# Altium PCB MainBoardPCB_4.PcbDoc (part 2 of 32)
Units mm, origin at the board's own origin, x right, y up, seen from the top; angles counter-clockwise.
Board outline 333.63 x 349.38 mm, 16 copper layers (L1, L2 (GND), L3 (Sign), L4 (GND), L5 (Sign), L6 (PWR/GND), L7(PWR/GND), L8 (Plane_GND), L9 (PWR/GND), L10 (PWR/GND), L11 (PWR/GND), L12 (Sign), L13 (GND), L14 (Sign), L15 (GND), L16), stack 2.502 mm thick; 2205 components, 1648 nets, 8314 pads, 3172 vias.
Unrouted connection lines stored in the file: 5141.
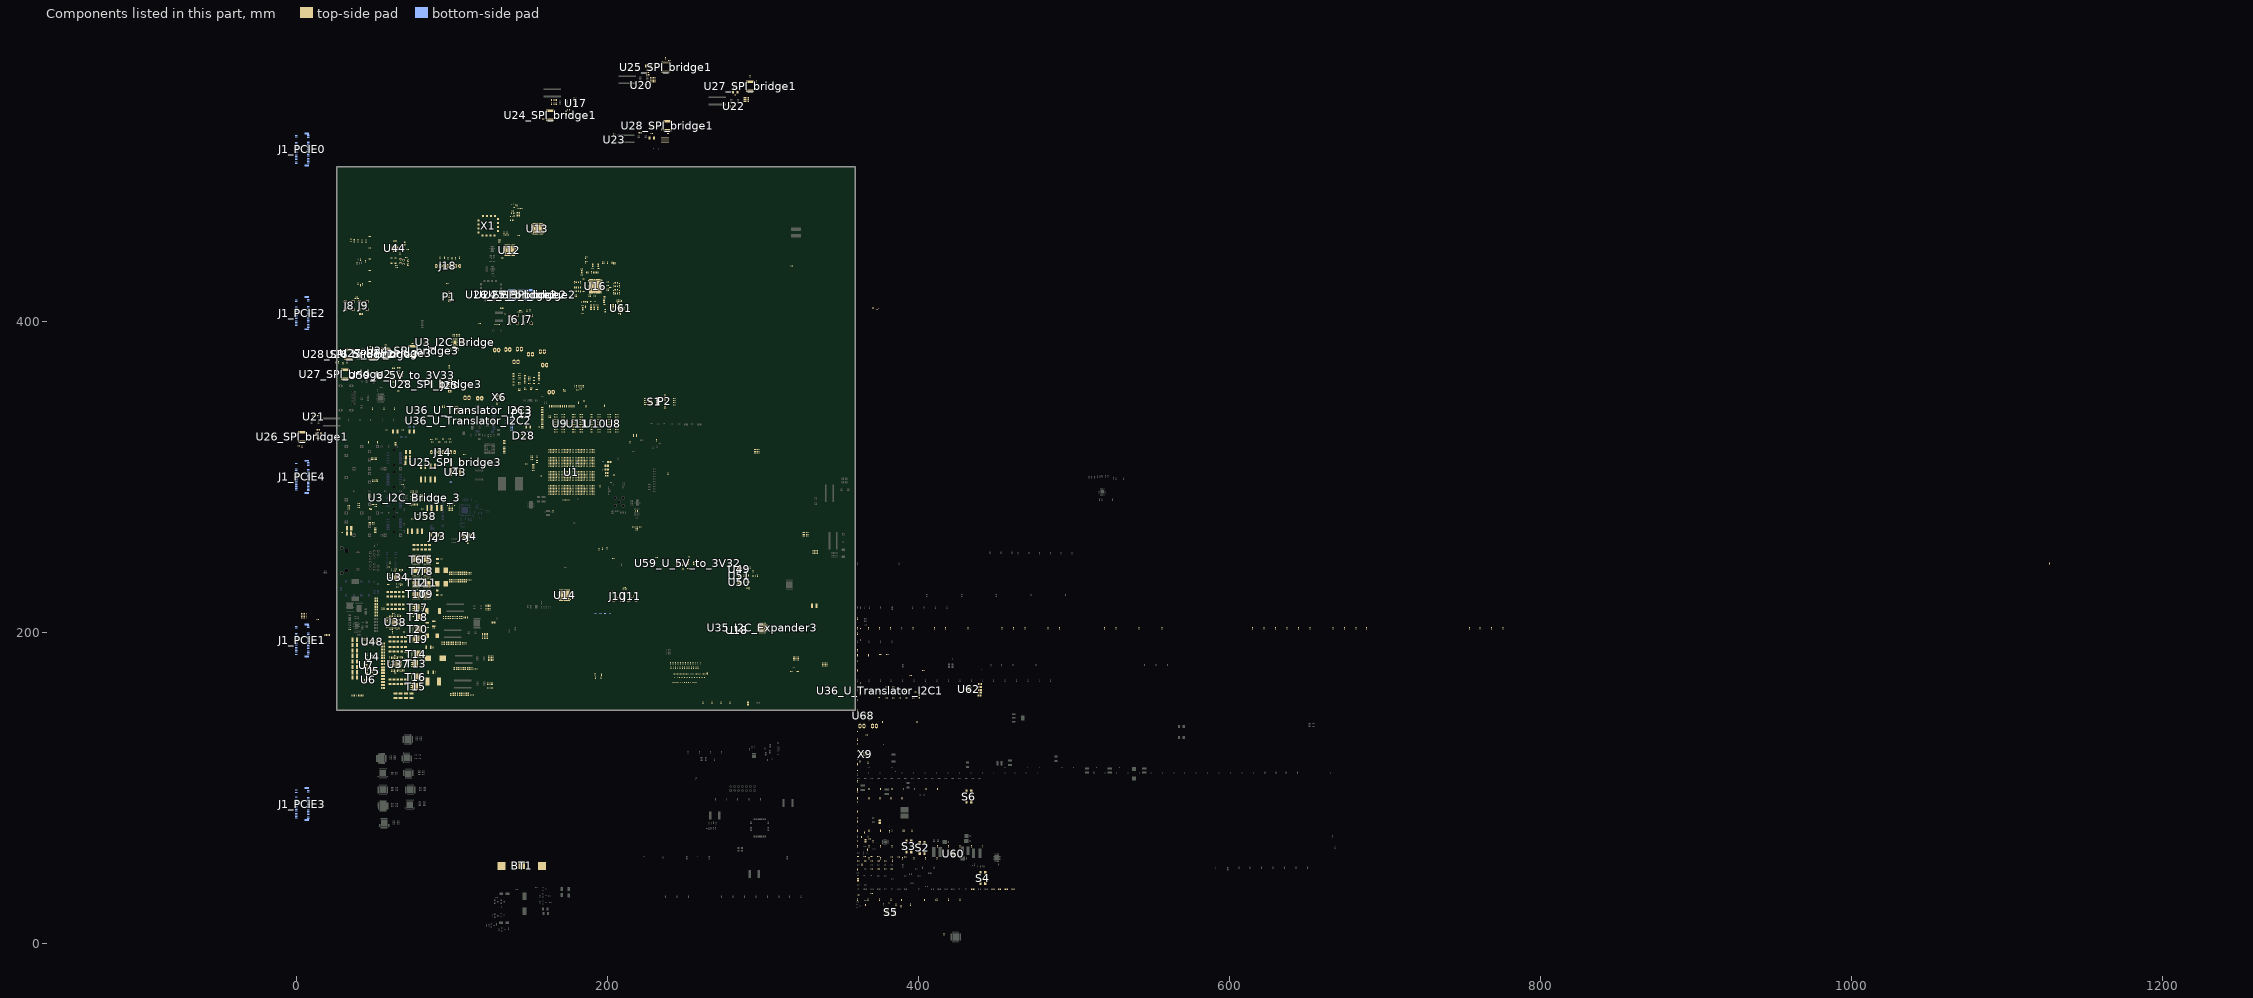
[diagram p14: the components of this part, seen from the top]

## Classes and differential pairs (continued)
differential pair class Diff_100: B223_Rx0 B223_Rx1 B223_Rx2 B223_Rx3 B223_Tx0_to_C B223_Tx0C_to_B B223_Tx1_to_C B223_Tx1C_to_B B223_Tx2_to_C B223_Tx2C_to_B B223_Tx3_to_C B223_Tx3C_to_B B224_Rx0 B224_Rx1 B224_Rx2 B224_Rx3 B224_Tx0_to_C B224_Tx0C_to_B B224_Tx1_to_C B224_Tx1C_to_B B224_Tx2_to_C B224_Tx2C_to_B B224_Tx3_to_C B224_Tx3C_to_B B225_Rx0 B225_Rx1 B225_Rx2 B225_Rx3 B225_Tx0_to_C B225_Tx0C_to_B B225_Tx1_to_C B225_Tx1C_to_B B225_Tx2_to_C B225_Tx2C_to_B B225_Tx3_to_C B225_Tx3C_to_B Bank223_MGTREF0_C Bank223_MGTREF1_C Bank224_MGTREF0_C Bank224_MGTREF1_C Bank225_MGTREF0_C Bank225_MGTREF1_C Bank505_MGTRREF0_C Bank505_MGTRREF2_C Bank505_MGTRREF3_C CLK_100 CLK_Fanout_In CLK_GTR_T1 CLK_GTR_T2 CLK_GTR_T3 CLK_Hi_Rail1 CLK_Hi_Rail1_SysRef CLK_Hi_Rail2 CLK_Hi_Rail2_SysRef CLK_M_OSC_In CLK_NVME_Conn CLK_Q223_T1 CLK_Q224_T1 CLK_Q225_T1 CLK_Q226_T1 CLK_SMA0 CLK_SMA0_C CLK_SMA1 CLK_SMA1_C CLK_SMA2 CLK_SMA2_C Data_2_RX_PCIE0 Data_2_RX_PCIE1 Data_2_RX_PCIE2 Data_2_RX_PCIE3 Data_2_TX_PCIE0 Data_2_TX_PCIE1 Data_2_TX_PCIE2 Data_2_TX_PCIE3 Data_3_RX_PCIE0 Data_3_RX_PCIE1 Data_3_RX_PCIE2 Data_3_RX_PCIE3 Data_3_TX_PCIE0 Data_3_TX_PCIE1 Data_3_TX_PCIE2 Data_3_TX_PCIE3 LTC6952_1_REF LTC6952_2_REF LTC6952_2_REF_SMA LTC6952_3_REF LTC6952_3_REF_SMA NVME_C_RX_O NVME_C_TX_1 NVME_C_TX_O NVMe_CLK NVMe_Rx_0 NVMe_Rx_1 NVMe_Tx_0 NVMe_Tx_1 Osc_in_Si53323_2 OSC_Out_DIV PCIE0_CLK PCIE0_Sync PCIE0_SysRef PCIE0_SysRef_FPGA PCIE1_CLK PCIE1_Sync PCIE1_SysRef PCIE1_SysRef_FPGA PCIE2_CLK PCIE2_Sync PCIE2_SysRef PCIE2_SysRef_FPGA PCIE3_CLK PCIE3_Sync PCIE3_SysRef PCIE3_SysRef_FPGA PCIE4_CLK PCIE4_Sync PCIE4_SysRef PCIE4_SysRef_FPGA RefClk_Si53323 SFP0_Rx SFP0_Tx SFP1_Rx SFP1_Tx SFP2_Rx SFP2_Tx SFP3_Rx SFP3_Tx SGMI_C_Rx SGMI_C_Tx SGMI_CLK_C_Out SGMI_CLK_Out SGMI_Rx SGMI_Tx Si53323_1_Q1 Si53323_1_Q2 Si53323_1_Q2_LVDS Si53323_2_CLK1 Si53323_2_Q1 Si53323_2_Q2 Si53323_2_Q2_LVDS SYNC_PCIE0 SYNC_PCIE1 SYNC_PCIE2 SYNC_PCIE3 SYNC_PCIE4 SYSREF_PCIE0 SYSREF_PCIE1 SYSREF_PCIE2 SYSREF_PCIE3 SYSREF_PCIE4 TD_A TD_B TD_C TD_D WR_LMK_CLK_HF1 WR_LMK_CLK_HF2 WR_LMK_CLK_IN WR_Source_CLK
channel class Translator_I2C: U_Translator_I2C1 U_Translator_I2C2 U_Translator_I2C3
channel class 5V_to_3V3: 5V_to_3V3_for_FTDI U_5V_to_3V32 U_5V_to_3V33
net class SYSREF: PCIE0_SysRef_N PCIE0_SysRef_P PCIE1_SysRef_N PCIE1_SysRef_P PCIE2_SysRef_N PCIE2_SysRef_P PCIE3_SysRef_N PCIE3_SysRef_P PCIE4_SysRef_N PCIE4_SysRef_P
net class Distr_to_Conn: PCIE0_CLK_P PCIE1_CLK_P PCIE2_CLK_P PCIE3_CLK_P PCIE4_CLK_P
net class SFP_diff: SFP0_Rx_N SFP0_Rx_P SFP0_Tx_N SFP0_Tx_P SFP1_Rx_N SFP1_Rx_P SFP1_Tx_N SFP1_Tx_P SFP2_Rx_N SFP2_Rx_P SFP2_Tx_N SFP2_Tx_P SFP3_Rx_N SFP3_Rx_P SFP3_Tx_N SFP3_Tx_P
net class Conn_to_C: B223_Tx0_to_C_N B223_Tx0_to_C_P B223_Tx1_to_C_N B223_Tx1_to_C_P B223_Tx2_to_C_N B223_Tx2_to_C_P B223_Tx3_to_C_N B223_Tx3_to_C_P B224_Tx0_to_C_N B224_Tx0_to_C_P B224_Tx1_to_C_N B224_Tx1_to_C_P B224_Tx2_to_C_N B224_Tx2_to_C_P B224_Tx3_to_C_N B224_Tx3_to_C_P B225_Tx0_to_C_N B225_Tx0_to_C_P B225_Tx1_to_C_N B225_Tx1_to_C_P B225_Tx2_to_C_N B225_Tx2_to_C_P B225_Tx3_to_C_N B225_Tx3_to_C_P Data_2_TX_PCIE0_N Data_2_TX_PCIE0_P Data_2_TX_PCIE1_N Data_2_TX_PCIE1_P Data_2_TX_PCIE2_N Data_2_TX_PCIE2_P Data_2_TX_PCIE3_N Data_2_TX_PCIE3_P Data_3_TX_PCIE0_N Data_3_TX_PCIE0_P Data_3_TX_PCIE1_N Data_3_TX_PCIE1_P Data_3_TX_PCIE2_N Data_3_TX_PCIE2_P Data_3_TX_PCIE3_N Data_3_TX_PCIE3_P
net class C_to_Bank225: B225_Tx0C_to_B_N B225_Tx0C_to_B_P B225_Tx1C_to_B_N B225_Tx1C_to_B_P B225_Tx2C_to_B_N B225_Tx2C_to_B_P B225_Tx3C_to_B_N B225_Tx3C_to_B_P
net class C_to_Bank224: B224_Tx0C_to_B_N B224_Tx0C_to_B_P B224_Tx1C_to_B_N B224_Tx1C_to_B_P B224_Tx2C_to_B_N B224_Tx2C_to_B_P B224_Tx3C_to_B_N B224_Tx3C_to_B_P
net class C_to_Bank223: B223_Rx0_N B223_Rx0_P B223_Rx1_N B223_Rx1_P B223_Rx2_N B223_Rx2_P B223_Rx3_N B223_Rx3_P B223_Tx0C_to_B_N B223_Tx0C_to_B_P B223_Tx1C_to_B_N B223_Tx1C_to_B_P B223_Tx2C_to_B_N B223_Tx2C_to_B_P B223_Tx3C_to_B_N B223_Tx3C_to_B_P
net class Bank_to_Conn: B223_Rx0_N B223_Rx0_P B223_Rx1_N B223_Rx1_P B223_Rx2_N B223_Rx2_P B223_Rx3_N B223_Rx3_P B224_Rx0_N B224_Rx0_P B224_Rx1_N B224_Rx1_P B224_Rx2_N B224_Rx2_P B224_Rx3_N B224_Rx3_P B225_Rx0_N B225_Rx0_P B225_Rx1_N B225_Rx1_P B225_Rx2_N B225_Rx2_P B225_Rx3_N B225_Rx3_P Data_2_RX_PCIE0_N Data_2_RX_PCIE0_P Data_2_RX_PCIE1_N Data_2_RX_PCIE1_P Data_2_RX_PCIE2_N Data_2_RX_PCIE2_P Data_2_RX_PCIE3_N Data_2_RX_PCIE3_P Data_3_RX_PCIE0_N Data_3_RX_PCIE0_P Data_3_RX_PCIE1_N Data_3_RX_PCIE1_P Data_3_RX_PCIE2_N Data_3_RX_PCIE2_P Data_3_RX_PCIE3_N Data_3_RX_PCIE3_P
component class U_Translator_I2C3: TP60_U_Translator_I2C3 TP61_U_Translator_I2C3 U36_U_Translator_I2C3
component class U_Translator_I2C2: TP60_U_Translator_I2C2 TP61_U_Translator_I2C2 U36_U_Translator_I2C2
component class U_Translator_I2C1: TP60_U_Translator_I2C1 TP61_U_Translator_I2C1 U36_U_Translator_I2C1
component class U_TPS7A88_5V_Dual_3: C572 C573 C574 C575 C576 C577 C578 C579 R436 R437 R438 R439 R440 R441 U61
component class U_LT3042_12V_5V_LNLDO: C580 C581 C582 C583 C584 FB34 R442 R443 R444 R445 U62
component class U_ADP1741_3: C568 C569 C570 C571 FB33 R433 R434 U60
component class U_5V_to_3V33: C563_U_5V_to_3V33 C564_U_5V_to_3V33 C565_U_5V_to_3V33 C566_U_5V_to_3V33 C567_U_5V_to_3V33 R430_U_5V_to_3V33 R431_U_5V_to_3V33 R432_U_5V_to_3V33 U59_U_5V_to_3V33
component class U_5V_to_3V32: C563_U_5V_to_3V32 C564_U_5V_to_3V32 C565_U_5V_to_3V32 C566_U_5V_to_3V32 C567_U_5V_to_3V32 R430_U_5V_to_3V32 R431_U_5V_to_3V32 R432_U_5V_to_3V32 U59_U_5V_to_3V32
component class SPI_bridge3: R231_SPI_bridge3 R232_SPI_bridge3 R233_SPI_bridge3 R234_SPI_bridge3 R235_SPI_bridge3 R236_SPI_bridge3 R237_SPI_bridge3 R238_SPI_bridge3 R239_SPI_bridge3 R240_SPI_bridge3 TP50_SPI_bridge3 TP51_SPI_bridge3 TP52_SPI_bridge3 TP53_SPI_bridge3 TP56_SPI_bridge3 TP57_SPI_bridge3 TP58_SPI_bridge3 TP59_SPI_bridge3 U24_SPI_bridge3 U25_SPI_bridge3 U26_SPI_bridge3 U27_SPI_bridge3 U28_SPI_bridge3
component class Ram_Power: C219 C220 C221 C222 C223 C224 C225 C226 C227 C228 C229 C230 C231 C232 C233 C234 C235 C236 C237 C238 C239 C240 C241 C242 C243 C244 C245 C246 C247 C248 C249 C250 C251 C252 C253 C254 C255 C256 C257 C258 C259 C260 C261 C262 C263 C264 C265 C266 C782 C783 C784 C785 C786 C787 C788 C789 R165 R166 R167 R168 R169 R170 R171 R172
component class PS_Config: C531 C532 C533 C534 C535 C536 D5 D6 D7 D8 D9 D10 D11 D12 P2 P3 P4 P5 R346 R347 R348 R349 R350 R351 R352 R353 R354 R355 R356 R357 R358 R359 R360 R361 R367 R368 R369 R370 R371 R372 R373 R374 R375 R716 R717 R718 R719 R720 S1 S2 S3 S4 U43 U44 X5 X6
component class IMU: C561 C562 R425 R426 R429 R600 R601 U58
component class GTR: C525 C526 C527 C528 C529 C530 C649 C651 C653 C677 C715 C716 C717 C718 R69 R70 R126
component class "Bank 225": C291 C292 C293 C294 C295 C296 C297 C298 C299 C300 C301 C302
component class "Bank 224": C279 C280 C281 C282 C283 C284 C285 C286 C287 C288 C289 C290
component class "Bank 223": C267 C268 C269 C270 C271 C272 C273 C274 C275 C276 C277 C278
component class U_Power_Ethernet: C550 C551 C552 C553 C554 C555 C654 C655 C656 C657 R391 R392 R393 R394 R396 R397 R399 R632 R633 R634 U49 U50 U51 U68
component class U_Power_ADP1850_Dual_2: C430 C431 C432 C433 C434 C435 C436 C437 C438 C439 C440 C441 C442 C443 C444 C445 C446 C447 C448 C449 C450 C451 C452 C453 C454 C455 C456 C457 C458 C459 C460 C461 C462 C463 C464 C465 C466 C467 C468 C469 C470 C548 C549 C645 C646 C647 C648 C650 C652 L19 L20 R302 R303 R306 R307 R310 R312 R313 R314 R315 R316 R317 R318 R625 R626 R627 R628 R629 R631 R686 R687 T17 T18 T19 T20 U38
component class U_HI_Curr_ADP1850_3: C389 C390 C391 C392 C393 C394 C395 C396 C397 C398 C399 C400 C401 C402 C403 C404 C405 C406 C407 C408 C409 C410 C411 C412 C413 C414 C415 C416 C417 C418 C419 C420 C421 C422 C423 C424 C425 C426 C427 C428 C429 C637 C638 C639 C640 C641 C642 C643 C644 L11 L12 R285 R287 R288 R289 R290 R292 R293 R294 R295 R296 R297 R298 R299 R300 R619 R620 R621 R622 R623 R624 T13 T14 T15 T16 U37
component class "Zasilanie CLK": C55 C56 C57 C58 C59 C60 C61 C62 C63 C64 C65 C66 C67 C68 C69 C70 C71 C72 C73 C74 C75 C76 C77 C78 C79 C80 C81 C82 C83 C84 C85 C86 C87 C88 C89 C90 C91 C92 C93 C94 C95 C96 C97 C98 C99 C100 C101 C102 C103 C104 C105 C106 C107 C108 C109 C110 C111 C112 C113 C114 C115 C116 C117 C118 C119 C120 C121 C122 C123 C124 C125 C126 C127 C128 C129 C130 C131 C132 C133 C134 C135 C136 C137 C138 C139 C140 C141 C142 C143 C144 C145 C146 C147 C148 C149 C150 C151 C152 C153 C154 C155 C156 C157 C158 C159 C160 C161 C162 C163 C164 C165 C166 C167 C168 C169 C170 C171 C172 C173 C174 C175 C176 C177 C178 C179 C180 C181 C182 C183 C184 C185 C186 C187 C188 C189 C190 C191 C192 C193 C194 C195 C196 C197 C198 C199 C200 C201 C202 C203 C204 C205 C206 FB2 FB3 FB4 FB5 FB6 FB7 FB8 FB9 FB10 FB11 FB12 FB13 FB14 FB15 FB16 FB17 FB18 FB19 FB20 FB21 FB22 FB35 FB36 R738 R739 R740 R741 R742 R743 U16
component class PowerSelector: C4 C5 C6 C7 C8 C9 C10 C11 C12 C13 C14 C15 C16 C17 C18 C19 C20 C21 C22 C23 C24 C25 C26 C27 C28 C29 C30 C31 C32 C33 C34 C35 C766 C767 C768 C769 C770 C771 C772 C773 C774 C775 C776 C777 C778 C779 C780 C781 R11 R12 R13 R15 R17 R18 R19 R20 R21 R23 R25 R26 R27 R28 R29 R30 R630 R677 R678 R679 R680 R681 R682 R683 R684 R685 U4 U5 U6 U7 U48
channel class SPI_Muxes: SPI_bridge1 SPI_bridge2
channel class I2C_Expander: I2C_Expander4 I2C_Expander5
component class XilinxPower: B1 C627 C628 C629 C630 C631 C632 D28 FB38 FB39 FB40 FB41 FB42 J29 J30 R173 R276 R279 R282 R283 R286 R693 R694 R695 R696
component class "Xilinx Linux": J12 J13 J14 J15 J16 J17 J18 J19 J20 J21 J22 J23 J24 J25 P1 P13 R83 R84 R85 R86 R87 R88 R89 R90 R91 R92 R93 R94 R95 R96 R97 R98 R99 R100 R101 R102 R103 R104 R105 R106 R107 R108 R109 R110 R111 R112 R115 R116 R117 R118 R119 R120 R121 R122 R123 R362 R675 R737 R768 R769 R770 R771 R772 R773 R774 R775 R776 R777 R778 R779 R780 R781 R782 R783 R784 R785 R786 R787 R788 R789 R790 R791 R792 R793 R794 R795 R796 R797 R798 R799 R800 R801 R802 R803 R804 R805 R806 R807 R808 R809 R810 R811 R812 R813 R814 R815 R816 TP33 TP34 TP35 TP36 TP37 TP38 TP39 TP40 TP41 TP42
component class "WR CLK": C588 C589 C590 C591 C592 FB37 R1 R2 R125 R127 R128 R129 R130 R131 R132 R133 R134 R139 R311 R366 R498 R499 R540 R543 R544 R545 R692 S6 X9
component class U_HI_Curr_ADP1850_1: C345 C346 C347 C348 C349 C350 C351 C352 C353 C356 C357 C358 C359 C360 C361 C362 C363 C364 C365 C366 C367 C368 C369 C370 C371 C372 C373 C374 C375 C376 C377 C378 C379 C380 C381 C382 C383 C384 C385 C386 C387 C388 C633 C634 C635 C636 L9 L10 R268 R271 R272 R273 R275 R277 R278 R280 R610 R611 R612 R613 R614 R615 R616 T5 T6 T7 T8 T9 T10 T11 T12 U34
component class SPI_bridge2: R231_SPI_bridge2 R232_SPI_bridge2 R233_SPI_bridge2 R234_SPI_bridge2 R235_SPI_bridge2 R236_SPI_bridge2 R237_SPI_bridge2 R238_SPI_bridge2 R239_SPI_bridge2 R240_SPI_bridge2 TP50_SPI_bridge2 TP51_SPI_bridge2 TP52_SPI_bridge2 TP53_SPI_bridge2 TP54_SPI_bridge2 TP55_SPI_bridge2 TP56_SPI_bridge2 TP57_SPI_bridge2 TP58_SPI_bridge2 TP59_SPI_bridge2 U24_SPI_bridge2 U25_SPI_bridge2 U26_SPI_bridge2 U27_SPI_bridge2 U28_SPI_bridge2
component class SPI_bridge1: R231_SPI_bridge1 R232_SPI_bridge1 R233_SPI_bridge1 R234_SPI_bridge1 R235_SPI_bridge1 R236_SPI_bridge1 R237_SPI_bridge1 R238_SPI_bridge1 R239_SPI_bridge1 R240_SPI_bridge1 TP53_SPI_bridge1 TP56_SPI_bridge1 TP57_SPI_bridge1 TP58_SPI_bridge1 TP59_SPI_bridge1 U24_SPI_bridge1 U25_SPI_bridge1 U26_SPI_bridge1 U27_SPI_bridge1 U28_SPI_bridge1
component class SFP3: C215 C216 C217 C218 L7 L8 R155 R156 R157 R158 R161 R162 R163 R164
component class SFP2: C211 C212 C213 C214 L5 L6 R145 R146 R147 R148 R151 R152 R153 R154
component class SFP1: C207 C208 C209 C210 L3 L4 R135 R136 R137 R138 R141 R142 R143 R144
component class Ram: C36 R31 R32 R33 R34 R35 R36 R37 R38 R39 R40 R41 R42 R43 R44 R45 R46 R47 R48 R49 R50 R51 R52 R53 R54 R55 R56 R57 R58 R59 R60 R61 R62 R63 R64 U8 U9 U10 U11
component class Power4HighSpeed: R174 R175 R176 R177 R178 R179 R180 R181 R182 R183 R184 R185 R186 R187 R188 R189 R190 R191 R192 R193 R194 R195 R196 R197 R198 R199 R200 R201 R202 R203 R204 R205 R206 R207 R208 R209 R210 R211 R213 R215 R217 R219 R221 R222 R228 R602 R603 R604 R605 R606 U17 U20 U21 U22 U23
component class I2C_Expander3: C311_I2C_Expander3 U35_I2C_Expander3
component class Ext_GPIO: R241 R242 R243 R244 R281 R400 R428 R492 R493 R494 R495 R496 R497 R500 R501 R502 R503 R504 R505 R508 R509 R510 R511 R512 R513 R516 R517 R518 R519 R520 R521 R524 R525 R526 R527 R528 R529 R599 R697 R698 R699 R700 R701 R702 R703 R704 R705 R706 R707 R708 R832 R833 R834 R835 R836 R837 R838 R839 R840 R841 TP62 TP63 TP64 TP65 TP66 TP67 TP68 TP69 TP70 TP71 TP72 TP73 TP74 TP75 TP76 TP77 TP78 TP79 TP80 TP81 TP82 TP83 TP84 TP85 TP86 TP87 TP88
component class HiCurrent: C331 C332 R14 R16 R22 R24 R266 R267 R269 R304 R388 R389 R390 R561 R562 R563 R564 R565 R566 R567 R568 R569 R570 R571 R572 R573 R574 R575 R576 R577 R578 R579 R580 R581 R582 R583 R584 R585 R586 R587 R588 R589 R590 R591 R592 S5 U18
component class PCIE4: C1_PCIE4 C2_PCIE4 C3_PCIE4 D1_PCIE4 FB1_PCIE4 J1_PCIE4
component class PCIE3: C1_PCIE3 C2_PCIE3 C3_PCIE3 D1_PCIE3 FB1_PCIE3 J1_PCIE3
component class PCIE2: C1_PCIE2 C2_PCIE2 C3_PCIE2 D1_PCIE2 FB1_PCIE2 J1_PCIE2
component class PCIE1: C1_PCIE1 C2_PCIE1 C3_PCIE1 D1_PCIE1 FB1_PCIE1 J1_PCIE1
component class PCIE0: C1_PCIE0 C2_PCIE0 C3_PCIE0 D1_PCIE0 FB1_PCIE0 J1_PCIE0
component class ClockDistrib: C41 C42 C43 C44 C45 C46 C47 C48 C49 C50 C51 C52 C53 C54 C334 C335 C593 C594 J2 J3 J4 J5 J6 J7 J8 J9 J10 J11 R75 R76 R77 R78 R79 R80 R81 R82 R270 R532 R533 R534 R535 R536 R537 R539 TP19 TP20 U12 U13 U14 X1
channel class PCIe: PCIE0 PCIE1 PCIE2 PCIE3 PCIE4
channel class I2C_Bridge: I2C_Bridge I2C_Bridge_3
component class "Bank 226": U1
component class SFP0: C37 C38 C39 C40 L1 L2 R65 R66 R67 R68 R71 R72 R73 R74
component class I2C_Bridge_3: C303_I2C_Bridge_3 R3_I2C_Bridge_3 R4_I2C_Bridge_3 R5_I2C_Bridge_3 R6_I2C_Bridge_3 R7_I2C_Bridge_3 R8_I2C_Bridge_3 R9_I2C_Bridge_3 R10_I2C_Bridge_3 R223_I2C_Bridge_3 R224_I2C_Bridge_3 R225_I2C_Bridge_3 R226_I2C_Bridge_3 R227_I2C_Bridge_3 R558_I2C_Bridge_3 R559_I2C_Bridge_3 R560_I2C_Bridge_3 TP1_I2C_Bridge_3 TP2_I2C_Bridge_3 TP3_I2C_Bridge_3 TP4_I2C_Bridge_3 TP5_I2C_Bridge_3 TP6_I2C_Bridge_3 TP8_I2C_Bridge_3 TP9_I2C_Bridge_3 TP10_I2C_Bridge_3 TP11_I2C_Bridge_3 TP15_I2C_Bridge_3 TP16_I2C_Bridge_3 TP17_I2C_Bridge_3 TP18_I2C_Bridge_3 U3_I2C_Bridge_3
component class I2C_Bridge: C303_I2C_Bridge R3_I2C_Bridge R4_I2C_Bridge R5_I2C_Bridge R6_I2C_Bridge R7_I2C_Bridge R8_I2C_Bridge R9_I2C_Bridge R10_I2C_Bridge R223_I2C_Bridge R224_I2C_Bridge R225_I2C_Bridge R226_I2C_Bridge R227_I2C_Bridge R558_I2C_Bridge R559_I2C_Bridge R560_I2C_Bridge TP1_I2C_Bridge TP2_I2C_Bridge TP3_I2C_Bridge TP4_I2C_Bridge TP5_I2C_Bridge TP6_I2C_Bridge TP8_I2C_Bridge TP9_I2C_Bridge TP10_I2C_Bridge TP11_I2C_Bridge TP15_I2C_Bridge TP16_I2C_Bridge TP17_I2C_Bridge TP18_I2C_Bridge U3_I2C_Bridge
differential pair USB_TX: +USB_TX_P -USB_TX_N
differential pair USB_TX_C: +USB_TX_C_P -USB_TX_C_N
differential pair USB_RX: +USB_RX_P -USB_RX_N
differential pair USB_RX_C: +USB_RX_C_P -USB_RX_C_N
differential pair USB_D: +USB_D_P -USB_D_N
differential pair TD_D: +TD_D_P -TD_D_N
differential pair TD_C: +TD_C_P -TD_C_N
differential pair TD_B: +TD_B_P -TD_B_N
differential pair TD_A: +TD_A_P -TD_A_N
differential pair SGMI_Tx: +SGMI_Tx_P -SGMI_Tx_N
differential pair SGMI_Rx: +SGMI_Rx_P -SGMI_Rx_N
differential pair SGMI_C_Tx: +SGMI_C_Tx_P -SGMI_C_Tx_N
differential pair SGMI_C_Rx: +SGMI_C_Rx_P -SGMI_C_Rx_N
differential pair NVMe_Tx_1: +NVMe_Tx_1_P -NVMe_Tx_1_N
differential pair NVMe_Tx_0: +NVMe_Tx_0_P -NVMe_Tx_0_N
differential pair NVMe_Rx_1: +NVMe_Rx_1_P -NVMe_Rx_1_N
differential pair NVMe_Rx_0: +NVMe_Rx_0_P -NVMe_Rx_0_N
differential pair DDR4_DQS_8: +DDR4_DQS_8_P -DDR4_DQS_8_N
differential pair DDR4_DQS_4: +DDR4_DQS_4_P -DDR4_DQS_4_N
differential pair NVME_C_TX_O: +NVME_C_TX_O_P -NVME_C_TX_O_N
differential pair NVME_C_TX_1: +NVME_C_TX_1_P -NVME_C_TX_1_N
differential pair NVME_C_RX_O: +NVME_C_RX_O_P -NVME_C_RX_O_N
differential pair WR_Source_CLK: +WR_Source_CLK_P -WR_Source_CLK_N
differential pair WR_LMK_CLK_IN: +WR_LMK_CLK_IN_P -WR_LMK_CLK_IN_N
differential pair WR_LMK_CLK_HF2: +WR_LMK_CLK_HF2_P -WR_LMK_CLK_HF2_N
differential pair WR_LMK_CLK_HF1: +WR_LMK_CLK_HF1_P -WR_LMK_CLK_HF1_N
differential pair PCIE4_SysRef_FPGA: +PCIE4_SysRef_FPGA_P -PCIE4_SysRef_FPGA_N
differential pair PCIE3_SysRef_FPGA: +PCIE3_SysRef_FPGA_P -PCIE3_SysRef_FPGA_N
differential pair PCIE2_SysRef_FPGA: +PCIE2_SysRef_FPGA_P -PCIE2_SysRef_FPGA_N
differential pair PCIE1_SysRef_FPGA: +PCIE1_SysRef_FPGA_P -PCIE1_SysRef_FPGA_N
differential pair PCIE0_SysRef_FPGA: +PCIE0_SysRef_FPGA_P -PCIE0_SysRef_FPGA_N
differential pair CLK_Fanout_In: +CLK_Fanout_In_P -CLK_Fanout_In_N
differential pair LTC6952_3_REF: +LTC6952_3_REF_P -LTC6952_3_REF_N
differential pair LTC6952_3_REF_SMA: +LTC6952_3_REF_SMA_P -LTC6952_3_REF_SMA_N
differential pair LTC6952_2_REF: +LTC6952_2_REF_P -LTC6952_2_REF_N
differential pair LTC6952_2_REF_SMA: +LTC6952_2_REF_SMA_P -LTC6952_2_REF_SMA_N
differential pair LTC6952_1_REF: +LTC6952_1_REF_P -LTC6952_1_REF_N
differential pair CLK_NVME_Conn: +CLK_NVME_Conn_P -CLK_NVME_Conn_N
differential pair CLK_Hi_Rail2: +CLK_Hi_Rail2_P -CLK_Hi_Rail2_N
differential pair CLK_Hi_Rail2_SysRef: +CLK_Hi_Rail2_SysRef_P -CLK_Hi_Rail2_SysRef_N
differential pair CLK_Hi_Rail1: +CLK_Hi_Rail1_P -CLK_Hi_Rail1_N
differential pair CLK_Hi_Rail1_SysRef: +CLK_Hi_Rail1_SysRef_P -CLK_Hi_Rail1_SysRef_N
differential pair CLK_GTR_T3: +CLK_GTR_T3_P -CLK_GTR_T3_N
differential pair CLK_GTR_T2: +CLK_GTR_T2_P -CLK_GTR_T2_N
differential pair CLK_GTR_T1: +CLK_GTR_T1_P -CLK_GTR_T1_N
differential pair Si53323_2_Q2_LVDS: +Si53323_2_Q2_LVDS_P -Si53323_2_Q2_LVDS_N
differential pair Si53323_1_Q2_LVDS: +Si53323_1_Q2_LVDS_P -Si53323_1_Q2_LVDS_N
differential pair Si53323_2_CLK1: +Si53323_2_CLK1_P -Si53323_2_CLK1_N
differential pair OSC_Out_DIV: +OSC_Out_DIV_P -OSC_Out_DIV_N
differential pair Osc_in_Si53323_2: +Osc_in_Si53323_2_P -Osc_in_Si53323_2_N
differential pair CLK_SMA2: +CLK_SMA2_P -CLK_SMA2_N
differential pair CLK_SMA2_C: +CLK_SMA2_C_P -CLK_SMA2_C_N
differential pair CLK_SMA1: +CLK_SMA1_P -CLK_SMA1_N
differential pair CLK_SMA1_C: +CLK_SMA1_C_P -CLK_SMA1_C_N
differential pair CLK_SMA0: +CLK_SMA0_P -CLK_SMA0_N
differential pair CLK_SMA0_C: +CLK_SMA0_C_P -CLK_SMA0_C_N
differential pair DDR4_DQS_7: +DDR4_DQS_7_P -DDR4_DQS_7_N
differential pair DDR4_DQS_6: +DDR4_DQS_6_P -DDR4_DQS_6_N
differential pair DDR4_DQS_5: +DDR4_DQS_5_P -DDR4_DQS_5_N
differential pair DDR4_DQS_3: +DDR4_DQS_3_P -DDR4_DQS_3_N
differential pair DDR4_DQS_2: +DDR4_DQS_2_P -DDR4_DQS_2_N
differential pair DDR4_DQS_1: +DDR4_DQS_1_P -DDR4_DQS_1_N
differential pair DDR4_DQS_0: +DDR4_DQS_0_P -DDR4_DQS_0_N
differential pair DDR4_CK: +DDR4_CK_P -DDR4_CK_N
differential pair Si53323_2_Q2: +Si53323_2_Q2_P -Si53323_2_Q2_N
differential pair Si53323_2_Q1: +Si53323_2_Q1_P -Si53323_2_Q1_N
differential pair Si53323_1_Q2: +Si53323_1_Q2_P -Si53323_1_Q2_N
differential pair Si53323_1_Q1: +Si53323_1_Q1_P -Si53323_1_Q1_N
differential pair RefClk_Si53323: +RefClk_Si53323_P -RefClk_Si53323_N
differential pair CLK_Q226_T1: +CLK_Q226_T1_P -CLK_Q226_T1_N
differential pair CLK_Q225_T1: +CLK_Q225_T1_P -CLK_Q225_T1_N
differential pair CLK_Q224_T1: +CLK_Q224_T1_P -CLK_Q224_T1_N
differential pair CLK_Q223_T1: +CLK_Q223_T1_P -CLK_Q223_T1_N
differential pair Bank505_MGTRREF3_C: +Bank505_MGTRREF3_C_P -Bank505_MGTRREF3_C_N
differential pair Bank505_MGTRREF2_C: +Bank505_MGTRREF2_C_P -Bank505_MGTRREF2_C_N
differential pair Bank505_MGTRREF0_C: +Bank505_MGTRREF0_C_P -Bank505_MGTRREF0_C_N
differential pair Bank225_MGTREF1_C: +Bank225_MGTREF1_C_P -Bank225_MGTREF1_C_N
differential pair Bank225_MGTREF0_C: +Bank225_MGTREF0_C_P -Bank225_MGTREF0_C_N
differential pair Bank224_MGTREF1_C: +Bank224_MGTREF1_C_P -Bank224_MGTREF1_C_N
differential pair Bank224_MGTREF0_C: +Bank224_MGTREF0_C_P -Bank224_MGTREF0_C_N
differential pair Bank223_MGTREF1_C: +Bank223_MGTREF1_C_P -Bank223_MGTREF1_C_N
differential pair Bank223_MGTREF0_C: +Bank223_MGTREF0_C_P -Bank223_MGTREF0_C_N
differential pair SYNC_PCIE4: +SYNC_PCIE4_P -SYNC_PCIE4_N
differential pair SYNC_PCIE3: +SYNC_PCIE3_P -SYNC_PCIE3_N
differential pair SYNC_PCIE2: +SYNC_PCIE2_P -SYNC_PCIE2_N
differential pair SYNC_PCIE1: +SYNC_PCIE1_P -SYNC_PCIE1_N
differential pair SYNC_PCIE0: +SYNC_PCIE0_P -SYNC_PCIE0_N
differential pair PCIE4_SysRef: +PCIE4_SysRef_P -PCIE4_SysRef_N
differential pair PCIE3_SysRef: +PCIE3_SysRef_P -PCIE3_SysRef_N
differential pair PCIE2_SysRef: +PCIE2_SysRef_P -PCIE2_SysRef_N
differential pair PCIE1_SysRef: +PCIE1_SysRef_P -PCIE1_SysRef_N
differential pair PCIE0_SysRef: +PCIE0_SysRef_P -PCIE0_SysRef_N
differential pair SFP3_Tx: +SFP3_Tx_P -SFP3_Tx_N
differential pair SFP3_Rx: +SFP3_Rx_P -SFP3_Rx_N
differential pair SFP2_Tx: +SFP2_Tx_P -SFP2_Tx_N
differential pair SFP2_Rx: +SFP2_Rx_P -SFP2_Rx_N
differential pair SFP1_Tx: +SFP1_Tx_P -SFP1_Tx_N
differential pair SFP1_Rx: +SFP1_Rx_P -SFP1_Rx_N
differential pair SFP0_Tx: +SFP0_Tx_P -SFP0_Tx_N
differential pair SFP0_Rx: +SFP0_Rx_P -SFP0_Rx_N
differential pair PCIE4_CLK: +PCIE4_CLK_P -PCIE4_CLK_N
differential pair PCIE3_CLK: +PCIE3_CLK_P -PCIE3_CLK_N
differential pair PCIE2_CLK: +PCIE2_CLK_P -PCIE2_CLK_N
differential pair PCIE1_CLK: +PCIE1_CLK_P -PCIE1_CLK_N
differential pair PCIE0_CLK: +PCIE0_CLK_P -PCIE0_CLK_N
differential pair B225_Tx3C_to_B: +B225_Tx3C_to_B_P -B225_Tx3C_to_B_N
differential pair B225_Tx3_to_C: +B225_Tx3_to_C_P -B225_Tx3_to_C_N
differential pair B225_Tx2C_to_B: +B225_Tx2C_to_B_P -B225_Tx2C_to_B_N
differential pair B225_Tx2_to_C: +B225_Tx2_to_C_P -B225_Tx2_to_C_N
differential pair B225_Tx1C_to_B: +B225_Tx1C_to_B_P -B225_Tx1C_to_B_N
differential pair B225_Tx1_to_C: +B225_Tx1_to_C_P -B225_Tx1_to_C_N
differential pair B225_Tx0C_to_B: +B225_Tx0C_to_B_P -B225_Tx0C_to_B_N
differential pair B225_Tx0_to_C: +B225_Tx0_to_C_P -B225_Tx0_to_C_N
differential pair B225_Rx3: +B225_Rx3_P -B225_Rx3_N
differential pair B225_Rx2: +B225_Rx2_P -B225_Rx2_N
differential pair B225_Rx1: +B225_Rx1_P -B225_Rx1_N
differential pair B225_Rx0: +B225_Rx0_P -B225_Rx0_N
differential pair B224_Tx3C_to_B: +B224_Tx3C_to_B_P -B224_Tx3C_to_B_N
differential pair B224_Tx3_to_C: +B224_Tx3_to_C_P -B224_Tx3_to_C_N
differential pair B224_Tx2C_to_B: +B224_Tx2C_to_B_P -B224_Tx2C_to_B_N
differential pair B224_Tx2_to_C: +B224_Tx2_to_C_P -B224_Tx2_to_C_N
differential pair B224_Tx1C_to_B: +B224_Tx1C_to_B_P -B224_Tx1C_to_B_N
differential pair B224_Tx1_to_C: +B224_Tx1_to_C_P -B224_Tx1_to_C_N
differential pair B224_Tx0C_to_B: +B224_Tx0C_to_B_P -B224_Tx0C_to_B_N
differential pair B224_Tx0_to_C: +B224_Tx0_to_C_P -B224_Tx0_to_C_N
differential pair B224_Rx3: +B224_Rx3_P -B224_Rx3_N
differential pair B224_Rx2: +B224_Rx2_P -B224_Rx2_N
differential pair B224_Rx1: +B224_Rx1_P -B224_Rx1_N
differential pair B224_Rx0: +B224_Rx0_P -B224_Rx0_N
differential pair B223_Tx3C_to_B: +B223_Tx3C_to_B_P -B223_Tx3C_to_B_N
differential pair B223_Tx3_to_C: +B223_Tx3_to_C_P -B223_Tx3_to_C_N
differential pair B223_Tx2C_to_B: +B223_Tx2C_to_B_P -B223_Tx2C_to_B_N
differential pair B223_Tx2_to_C: +B223_Tx2_to_C_P -B223_Tx2_to_C_N
differential pair B223_Tx1C_to_B: +B223_Tx1C_to_B_P -B223_Tx1C_to_B_N
differential pair B223_Tx1_to_C: +B223_Tx1_to_C_P -B223_Tx1_to_C_N
differential pair B223_Tx0C_to_B: +B223_Tx0C_to_B_P -B223_Tx0C_to_B_N
differential pair B223_Tx0_to_C: +B223_Tx0_to_C_P -B223_Tx0_to_C_N
differential pair B223_Rx3: +B223_Rx3_P -B223_Rx3_N
differential pair B223_Rx2: +B223_Rx2_P -B223_Rx2_N
differential pair B223_Rx1: +B223_Rx1_P -B223_Rx1_N
differential pair B223_Rx0: +B223_Rx0_P -B223_Rx0_N
differential pair Data_3_TX_PCIE3: +Data_3_TX_PCIE3_P -Data_3_TX_PCIE3_N
differential pair Data_3_TX_PCIE2: +Data_3_TX_PCIE2_P -Data_3_TX_PCIE2_N
differential pair Data_3_TX_PCIE1: +Data_3_TX_PCIE1_P -Data_3_TX_PCIE1_N
differential pair Data_3_TX_PCIE0: +Data_3_TX_PCIE0_P -Data_3_TX_PCIE0_N
differential pair Data_3_RX_PCIE3: +Data_3_RX_PCIE3_P -Data_3_RX_PCIE3_N
differential pair Data_3_RX_PCIE2: +Data_3_RX_PCIE2_P -Data_3_RX_PCIE2_N
differential pair Data_3_RX_PCIE1: +Data_3_RX_PCIE1_P -Data_3_RX_PCIE1_N
differential pair Data_3_RX_PCIE0: +Data_3_RX_PCIE0_P -Data_3_RX_PCIE0_N
differential pair Data_2_TX_PCIE3: +Data_2_TX_PCIE3_P -Data_2_TX_PCIE3_N
differential pair Data_2_TX_PCIE2: +Data_2_TX_PCIE2_P -Data_2_TX_PCIE2_N
differential pair Data_2_TX_PCIE1: +Data_2_TX_PCIE1_P -Data_2_TX_PCIE1_N
differential pair Data_2_TX_PCIE0: +Data_2_TX_PCIE0_P -Data_2_TX_PCIE0_N
differential pair Data_2_RX_PCIE3: +Data_2_RX_PCIE3_P -Data_2_RX_PCIE3_N
differential pair Data_2_RX_PCIE2: +Data_2_RX_PCIE2_P -Data_2_RX_PCIE2_N
differential pair Data_2_RX_PCIE1: +Data_2_RX_PCIE1_P -Data_2_RX_PCIE1_N
differential pair Data_2_RX_PCIE0: +Data_2_RX_PCIE0_P -Data_2_RX_PCIE0_N

## Components (designator, comment, footprint, x,y, rotation, side; value= is the part's Value field where it differs from the comment)
B1 "TS920E-FL27E" Battery 217.703,326.631 r0 top
BT1 "79523141" 79523141 145.009,49.886 r0 top
C1_PCIE0 "100nF" "CAP 0402/1005 RF" 175.118,537.889 r0 top (schematic designator C1)
C1_PCIE1 "100nF" "CAP 0402/1005 RF" 225.975,559.952 r180 top (schematic designator C1)
C1_PCIE2 "100nF" "CAP 0402/1005 RF" 13.819,208.225 r0 top (schematic designator C1)
C1_PCIE3 "100nF" "CAP 0402/1005 RF" 281.991,545.668 r180 top (schematic designator C1)
C1_PCIE4 "100nF" "CAP 0402/1005 RF" 228.564,520.7 r180 top (schematic designator C1)
C2_PCIE0 "2.2uF" "CAP 1206/3216 - 0.8MM" 174.864,533.19 r0 top (schematic designator C2)
C2_PCIE1 "2.2uF" "CAP 1206/3216 - 0.8MM" 226.238,564.143 r180 top (schematic designator C2)
C2_PCIE2 "2.2uF" "CAP 1206/3216 - 0.8MM" 14.297,327.631 r0 top (schematic designator C2)
C2_PCIE3 "2.2uF" "CAP 1206/3216 - 0.8MM" 282.118,547.319 r180 top (schematic designator C2)
C2_PCIE4 "2.2uF" "CAP 1206/3216 - 0.8MM" 228.691,517.817 r180 top (schematic designator C2)
C3_PCIE0 "4.7uF" "CAP 0603/1608 RF" 174.991,536.111 r0 top (schematic designator C3)
C3_PCIE1 "4.7uF" "CAP 0603/1608 RF" 226.111,561.476 r180 top (schematic designator C3)
C3_PCIE2 "4.7uF" "CAP 0603/1608 RF" 14.053,324.71 r0 top (schematic designator C3)
C3_PCIE3 "4.7uF" "CAP 0603/1608 RF" 282.118,551.51 r180 top (schematic designator C3)
C3_PCIE4 "4.7uF" "CAP 0603/1608 RF" 228.066,525.145 r180 top (schematic designator C3)
C4 "22uF" "CAP 1210/3225 - 1MM" 37.591,170.893 r180 top
C5 "22uF" "CAP 1210/3225 - 1MM" 37.591,174.348 r180 top
C6 "22uF" "CAP 1210/3225 - 1MM" 37.591,181.257 r180 top
C7 "22uF" "CAP 1210/3225 - 1MM" 37.591,177.802 r180 top
C8 "100nF" "CAP 0402/1005 RF" 39.985,159.376 r270 top
C9 "100nF" "CAP 0402/1005 RF" 42.83,159.376 r270 top
C10 "100nF" "CAP 0402/1005 RF" 41.901,159.376 r270 top
C11 "100nF" "CAP 0402/1005 RF" 40.965,159.376 r270 top
C12 "22uF" "CAP 1210/3225 - 1MM" 37.51,184.916 r180 top
C13 "22uF" "CAP 1210/3225 - 1MM" 37.51,191.806 r180 top
C14 "22uF" "CAP 1210/3225 - 1MM" 37.51,195.251 r180 top
C15 "22uF" "CAP 1210/3225 - 1MM" 37.51,188.361 r180 top
C16 "100nF" "CAP 0402/1005 RF" 18.529,198.266 r270 top
C17 "100nF" "CAP 0402/1005 RF" 21.364,198.266 r270 top
C18 "100nF" "CAP 0402/1005 RF" 20.365,198.266 r270 top
C19 "100nF" "CAP 0402/1005 RF" 19.46,198.266 r270 top
C20 "10uF" "CAP 0805/2012 RF" 55.719,164.138 r180 top
C21 "10uF" "CAP 0805/2012 RF" 55.746,169.941 r180 top
C22 "10uF" "CAP 0805/2012 RF" 55.746,168.043 r180 top
C23 "10uF" "CAP 0805/2012 RF" 55.746,175.635 r180 top
C24 "4.7uF" "CAP 0805/2012 RF" 55.746,171.839 r180 top
C25 "4.7uF" "CAP 0805/2012 RF" 55.746,173.737 r180 top
C26 "4.7uF" "CAP 0805/2012 RF" 55.746,177.532 r180 top
C27 "4.7uF" "CAP 0805/2012 RF" 55.746,166.145 r180 top
C28 "10uF" "CAP 0805/2012 RF" 55.758,187.161 r180 top
C29 "10uF" "CAP 0805/2012 RF" 55.758,185.263 r180 top
C30 "10uF" "CAP 0805/2012 RF" 55.758,181.467 r180 top
C31 "10uF" "CAP 0805/2012 RF" 55.758,179.569 r180 top
C32 "4.7uF" "CAP 0805/2012 RF" 55.758,183.365 r180 top
C33 "4.7uF" "CAP 0805/2012 RF" 55.758,189.059 r180 top
C34 "4.7uF" "CAP 0805/2012 RF" 55.758,190.956 r180 top
C35 "4.7uF" "CAP 0805/2012 RF" 55.784,192.899 r180 top
C36 "10nF" "CAP 0402/1005 RF" 155.956,331.965 r180 top
C37 "100nF" "CAP 0402/1005 RF" 29.299,264.312 r0 top
C38 "22uF" "CAP 1210/3225 - 1MM" 33.871,263.55 r0 top
C39 "100nF" "CAP 0402/1005 RF" 38.57,263.423 r0 top
C40 "22uF" "CAP 1210/3225 - 1MM" 33.923,266.979 r0 top
C41 "1uF" "CAP 0402/1005 RF" 90.054,258.034 r270 top
C42 "1uF" "CAP 0402/1005 RF" 90.954,258.034 r270 top
C43 "1uF" "CAP 0402/1005 RF" 110.881,257.529 r270 top
C44 "1uF" "CAP 0402/1005 RF" 109.981,257.529 r270 top
C45 "5.6nF" "CAP 0402/1005 RF" 131.053,452.303 r270 top
C46 "200pF" "CAP 0402/1005 RF" 130.153,452.303 r270 top
C47 "1uF" "CAP 0402/1005 RF" 144.718,406.037 r0 top
C48 "1uF" "CAP 0402/1005 RF" 143.038,406.037 r180 top
C49 "1uF" "CAP 0402/1005 RF" 39.677,414.757 r0 top
C50 "1uF" "CAP 0402/1005 RF" 37.997,414.757 r180 top
C51 "1uF" "CAP 0402/1005 RF" 212.021,227.978 r0 top
C52 "1uF" "CAP 0402/1005 RF" 210.341,227.978 r180 top
C53 "1uF" "CAP 0402/1005 RF" 218.46,267.242 r90 top
C54 "1uF" "CAP 0402/1005 RF" 219.36,267.242 r90 top
C55 "0.1µF" "CAP 0201/0603 RF" 100.292,283.421 r90 top
C56 "0.1µF" "CAP 0201/0603 RF" 98.387,283.421 r90 top
C57 "0.1µF" "CAP 0201/0603 RF" 97.244,281.77 r270 top
C58 "10µF" "CAP 0402/1005 RF" 98.387,281.776 r270 top
C59 "0.1µF" "CAP 0201/0603 RF" 144.138,472.357 r90 top
C60 "0.1µF" "CAP 0201/0603 RF" 143.249,472.357 r90 top
C61 "0.1µF" "CAP 0201/0603 RF" 139.808,475.674 r90 top
C62 "10µF" "CAP 0402/1005 RF" 138.535,475.544 r90 top
C63 "100nF" "CAP 0402/1005 RF" 189.1,412.326 r270 top
C64 "100nF" "CAP 0402/1005 RF" 198.227,415.882 r0 top
C65 "0.1µF" "CAP 0201/0603 RF" 101.181,283.427 r90 top
C66 "0.1µF" "CAP 0201/0603 RF" 97.498,283.427 r90 top
C67 "100nF" "CAP 0402/1005 RF" 192.49,415.882 r270 top
C68 "10nF" "CAP 0201/0603 RF" 101.689,281.776 r270 top
C69 "10µF" "CAP 0402/1005 RF" 100.292,281.776 r270 top
C70 "100nF" "CAP 0402/1005 RF" 189.99,412.326 r270 top
C71 "0.1µF" "CAP 0201/0603 RF" 140.201,472.369 r0 top
C72 "0.1µF" "CAP 0201/0603 RF" 140.068,473.258 r0 top
C73 "0.1µF" "CAP 0201/0603 RF" 138.795,472.369 r180 top
C74 "10µF" "CAP 0402/1005 RF" 139.185,470.972 r180 top
C75 "100nF" "CAP 0402/1005 RF" 200.241,420.766 r0 top
C76 "100nF" "CAP 0402/1005 RF" 200.241,422.994 r0 top
C77 "100nF" "CAP 0402/1005 RF" 184.62,421.266 r180 top
C78 "10uF" "CAP 0402/1005 RF" 191.49,415.882 r90 top
C79 "10uF" "CAP 0402/1005 RF" 192.99,431.425 r270 top
C80 "10uF" "CAP 0402/1005 RF" 186.585,431.425 r270 top
C81 "100nF" "CAP 0402/1005 RF" 184.62,419.266 r180 top
C82 "100nF" "CAP 0402/1005 RF" 200.241,425.266 r0 top
C83 "100nF" "CAP 0402/1005 RF" 184.62,426.113 r180 top
C84 "0.1µF" "CAP 0201/0603 RF" 137.788,467.67 r90 top
C85 "0.1µF" "CAP 0201/0603 RF" 144.9,472.357 r90 top
C86 "10nF" "CAP 0201/0603 RF" 138.804,467.676 r90 top
C87 "10µF" "CAP 0402/1005 RF" 139.947,467.676 r90 top
C88 "100nF" "CAP 0402/1005 RF" 184.62,427.113 r180 top
C89 "100nF" "CAP 0402/1005 RF" 193.99,431.425 r90 top
C90 "100nF" "CAP 0402/1005 RF" 191.05,431.425 r90 top
C91 "100nF" "CAP 0402/1005 RF" 191.99,431.425 r90 top
C92 "100nF" "CAP 0402/1005 RF" 200.241,419.766 r0 top
C93 "100nF" "CAP 0402/1005 RF" 191.986,412.326 r270 top
C94 "0.1µF" "CAP 0201/0603 RF" 145.662,472.363 r90 top
C95 "0.1µF" "CAP 0201/0603 RF" 142.36,472.363 r90 top
C96 "100nF" "CAP 0402/1005 RF" 187.585,431.425 r90 top
C97 "10nF" "CAP 0201/0603 RF" 140.963,474.519 r90 top
C98 "10µF" "CAP 0402/1005 RF" 141.852,474.519 r90 top
C99 "100nF" "CAP 0402/1005 RF" 183.537,412.395 r90 top
C100 "100nF" "CAP 0402/1005 RF" 207.734,424.749 r90 top
C101 "10uF" "CAP 0402/1005 RF" 187.347,412.404 r90 top
C102 "10uF" "CAP 0402/1005 RF" 203.788,424.749 r90 top
C103 "100nF" "CAP 0402/1005 RF" 198.227,410.931 r180 top
C104 "100nF" "CAP 0402/1005 RF" 178.769,425.156 r90 top
C105 "10uF" "CAP 0402/1005 RF" 198.227,414.877 r180 top
C106 "10uF" "CAP 0402/1005 RF" 182.715,425.156 r90 top
C107 "100nF" "CAP 0402/1005 RF" 193.769,406.475 r180 top
C108 "100nF" "CAP 0402/1005 RF" 183.528,433.758 r0 top
C109 "10uF" "CAP 0402/1005 RF" 193.769,410.421 r180 top
C110 "10uF" "CAP 0402/1005 RF" 183.528,429.812 r0 top
C111 "10nF" "CAP 0201/0603 RF" 244.752,167.951 r90 top
C112 "10nF" "CAP 0201/0603 RF" 245.979,167.951 r90 top
C113 "10nF" "CAP 0201/0603 RF" 250.89,167.951 r90 top
C114 "10nF" "CAP 0201/0603 RF" 254.573,167.951 r90 top
C115 "10nF" "CAP 0201/0603 RF" 255.801,167.951 r90 top
C116 "10nF" "CAP 0201/0603 RF" 253.345,167.951 r90 top
C117 "10nF" "CAP 0201/0603 RF" 243.524,167.951 r90 top
C118 "10nF" "CAP 0201/0603 RF" 242.296,167.951 r90 top
C119 "10nF" "CAP 0201/0603 RF" 249.662,167.951 r90 top
C120 "10nF" "CAP 0201/0603 RF" 257.028,167.951 r90 top
C121 "10nF" "CAP 0201/0603 RF" 247.207,167.951 r90 top
C122 "10nF" "CAP 0201/0603 RF" 248.435,167.951 r90 top
C123 "10nF" "CAP 0201/0603 RF" 252.118,167.951 r90 top
C124 "100nF" "CAP 0402/1005 RF" 189.49,406.475 r180 top
C125 "100nF" "CAP 0402/1005 RF" 194.38,437.98 r180 top
C126 "10uF" "CAP 0402/1005 RF" 189.49,410.421 r180 top
C127 "10uF" "CAP 0402/1005 RF" 194.38,434.034 r180 top
C128 "1uF" "CAP 0402/1005 RF" 246.531,171.368 r90 top
C129 "1uF" "CAP 0402/1005 RF" 254.502,171.368 r90 top
C130 "1uF" "CAP 0402/1005 RF" 248.125,171.368 r90 top
C131 "1uF" "CAP 0402/1005 RF" 256.096,171.368 r90 top
C132 "1uF" "CAP 0402/1005 RF" 260.879,171.368 r90 top
C133 "1uF" "CAP 0402/1005 RF" 243.343,171.368 r90 top
C134 "1uF" "CAP 0402/1005 RF" 251.314,171.368 r90 top
C135 "1uF" "CAP 0402/1005 RF" 249.72,171.368 r90 top
C136 "1uF" "CAP 0402/1005 RF" 257.69,171.368 r90 top
C137 "1uF" "CAP 0402/1005 RF" 262.473,171.368 r90 top
C138 "1uF" "CAP 0402/1005 RF" 244.937,171.368 r90 top
C139 "1uF" "CAP 0402/1005 RF" 252.908,171.368 r90 top
C140 "1uF" "CAP 0402/1005 RF" 259.284,171.368 r90 top
C141 "100nF" "CAP 0402/1005 RF" 207.774,420.229 r270 top
C142 "100nF" "CAP 0402/1005 RF" 190.56,437.98 r0 top
C143 "10uF" "CAP 0402/1005 RF" 203.828,420.229 r270 top
C144 "10uF" "CAP 0402/1005 RF" 190.56,434.034 r0 top
C145 "100nF" "CAP 0402/1005 RF" 207.734,422.604 r90 top
C146 "100nF" "CAP 0402/1005 RF" 207.774,418.032 r270 top
C147 "10uF" "CAP 0402/1005 RF" 203.788,422.604 r90 top
C148 "10uF" "CAP 0402/1005 RF" 203.828,418.032 r270 top
C149 "10nF" "CAP 0201/0603 RF" 257.361,173.521 r90 top
C150 "10nF" "CAP 0201/0603 RF" 260.98,173.521 r90 top
C151 "10nF" "CAP 0201/0603 RF" 256.457,173.521 r90 top
C152 "10nF" "CAP 0201/0603 RF" 259.171,173.521 r90 top
C153 "10nF" "CAP 0201/0603 RF" 254.648,173.521 r90 top
C154 "10nF" "CAP 0201/0603 RF" 260.075,173.521 r90 top
C155 "10nF" "CAP 0201/0603 RF" 255.552,173.521 r90 top
C156 "10nF" "CAP 0201/0603 RF" 258.266,173.521 r90 top
C157 "10nF" "CAP 0201/0603 RF" 253.743,173.521 r90 top
C158 "10nF" "CAP 0201/0603 RF" 263.631,173.533 r90 top
C159 "10nF" "CAP 0201/0603 RF" 262.789,173.521 r90 top
C160 "10nF" "CAP 0201/0603 RF" 264.393,173.533 r90 top
C161 "10nF" "CAP 0201/0603 RF" 261.884,173.521 r90 top
C162 "100nF" "CAP 0402/1005 RF" 178.905,421.824 r270 top
C163 "100nF" "CAP 0402/1005 RF" 191.596,406.475 r180 top
C164 "10uF" "CAP 0402/1005 RF" 182.715,421.824 r90 top
C165 "10uF" "CAP 0402/1005 RF" 191.596,410.421 r180 top
C166 "10nF" "CAP 0201/0603 RF" 242.803,173.521 r90 top
C167 "10nF" "CAP 0201/0603 RF" 246.666,173.521 r90 top
C168 "10nF" "CAP 0201/0603 RF" 250.529,173.521 r90 top
C169 "10nF" "CAP 0201/0603 RF" 243.576,173.521 r90 top
C170 "10nF" "CAP 0201/0603 RF" 247.439,173.521 r90 top
C171 "10nF" "CAP 0201/0603 RF" 244.348,173.521 r90 top
C172 "10nF" "CAP 0201/0603 RF" 248.211,173.521 r90 top
C173 "10nF" "CAP 0201/0603 RF" 252.074,173.521 r90 top
C174 "10nF" "CAP 0201/0603 RF" 245.893,173.521 r90 top
C175 "10nF" "CAP 0201/0603 RF" 248.984,173.521 r90 top
C176 "10nF" "CAP 0201/0603 RF" 251.302,173.521 r90 top
C177 "10nF" "CAP 0201/0603 RF" 245.121,173.521 r90 top
C178 "10nF" "CAP 0201/0603 RF" 249.756,173.521 r90 top
C179 "100nF" "CAP 0402/1005 RF" 178.669,419.175 r90 top
C180 "10uF" "CAP 0402/1005 RF" 182.715,419.175 r90 top
C181 "1uF" "CAP 0402/1005 RF" 258.424,177.198 r90 top
C182 "1uF" "CAP 0402/1005 RF" 240.898,177.198 r90 top
C183 "1uF" "CAP 0402/1005 RF" 249.661,177.198 r90 top
C184 "1uF" "CAP 0402/1005 RF" 242.359,177.198 r90 top
C185 "1uF" "CAP 0402/1005 RF" 251.122,177.198 r90 top
C186 "1uF" "CAP 0402/1005 RF" 248.201,177.198 r90 top
C187 "1uF" "CAP 0402/1005 RF" 256.964,177.198 r90 top
C188 "1uF" "CAP 0402/1005 RF" 243.819,177.198 r90 top
C189 "1uF" "CAP 0402/1005 RF" 252.582,177.198 r90 top
C190 "1uF" "CAP 0402/1005 RF" 246.74,177.198 r90 top
C191 "1uF" "CAP 0402/1005 RF" 255.503,177.198 r90 top
C192 "1uF" "CAP 0402/1005 RF" 245.28,177.198 r90 top
C193 "1uF" "CAP 0402/1005 RF" 254.043,177.198 r90 top
C194 "1uF" "CAP 0402/1005 RF" 248.588,180.137 r90 top
C195 "1uF" "CAP 0402/1005 RF" 258.142,180.137 r90 top
C196 "1uF" "CAP 0402/1005 RF" 254.957,180.137 r90 top
C197 "1uF" "CAP 0402/1005 RF" 246.995,180.137 r90 top
C198 "1uF" "CAP 0402/1005 RF" 259.734,180.137 r90 top
C199 "1uF" "CAP 0402/1005 RF" 253.365,180.137 r90 top
C200 "1uF" "CAP 0402/1005 RF" 251.772,180.137 r90 top
C201 "1uF" "CAP 0402/1005 RF" 256.549,180.137 r90 top
C202 "1uF" "CAP 0402/1005 RF" 250.18,180.137 r90 top
C203 "1uF" "CAP 0402/1005 RF" 240.626,180.137 r90 top
C204 "1uF" "CAP 0402/1005 RF" 243.811,180.137 r90 top
C205 "1uF" "CAP 0402/1005 RF" 242.219,180.137 r90 top
C206 "1uF" "CAP 0402/1005 RF" 245.403,180.137 r90 top
C207 "100nF" "CAP 0402/1005 RF" 57.874,330.225 r0 top
C208 "22uF" "CAP 1210/3225 - 1MM" 63.716,329.082 r0 top
C209 "100nF" "CAP 0402/1005 RF" 68.415,330.225 r0 top
C210 "22uF" "CAP 1210/3225 - 1MM" 74.13,329.082 r0 top
C211 "100nF" "CAP 0402/1005 RF" 68.415,295.046 r180 top
C212 "22uF" "CAP 1210/3225 - 1MM" 332.956,217.068 r0 top
C213 "100nF" "CAP 0402/1005 RF" 63.716,320.358 r0 top
C214 "22uF" "CAP 1210/3225 - 1MM" 71.717,309.016 r0 top
C215 "100nF" "CAP 0402/1005 RF" 63.716,322.136 r0 top
C216 "22uF" "CAP 1210/3225 - 1MM" 71.844,316.001 r0 top
C217 "100nF" "CAP 0402/1005 RF" 63.716,321.247 r0 top
C218 "22uF" "CAP 1210/3225 - 1MM" 71.844,312.445 r0 top
C219 "100nF" "CAP 0402/1005 RF" 181.281,358.296 r90 top
C220 "100nF" "CAP 0402/1005 RF" 184.677,358.28 r90 top
C221 "100nF" "CAP 0402/1005 RF" 178.725,358.296 r90 top
C222 "100nF" "CAP 0402/1005 RF" 183.678,358.28 r90 top
C223 "4.7uF" "CAP 0402/1005 RF" 143.407,366.37 r0 top
C224 "470nF" "CAP 0402/1005 RF" 147.155,364.211 r0 top
C225 "470nF" "CAP 0402/1005 RF" 139.671,359.893 r0 top
C226 "68nF" "CAP 0402/1005 RF" 149.753,365.354 r0 top
C227 "68nF" "CAP 0402/1005 RF" 139.662,361.798 r0 top
C228 "4.7uF" "CAP 0402/1005 RF" 147.028,365.227 r0 top
C229 "470nF" "CAP 0402/1005 RF" 149.744,364.211 r0 top
C230 "470nF" "CAP 0402/1005 RF" 139.653,360.909 r0 top
C231 "68nF" "CAP 0402/1005 RF" 139.662,366.37 r0 top
C232 "68nF" "CAP 0402/1005 RF" 143.407,363.957 r0 top
C233 "4.7uF" "CAP 0402/1005 RF" 149.753,362.179 r0 top
C234 "470nF" "CAP 0402/1005 RF" 139.662,365.481 r0 top
C235 "470nF" "CAP 0402/1005 RF" 143.407,362.814 r0 top
C236 "68nF" "CAP 0402/1005 RF" 143.398,365.227 r0 top
C237 "68nF" "CAP 0402/1005 RF" 147.146,363.322 r0 top
C238 "4.7uF" "CAP 0402/1005 RF" 149.744,361.163 r0 top
C239 "470nF" "CAP 0402/1005 RF" 139.662,364.592 r0 top
C240 "470nF" "CAP 0402/1005 RF" 143.407,361.798 r0 top
C241 "68nF" "CAP 0402/1005 RF" 147.155,360.401 r0 top
C242 "68nF" "CAP 0402/1005 RF" 147.155,361.29 r0 top
C243 "100nF" "CAP 0402/1005 RF" 147.155,357.234 r0 top
C244 "100nF" "CAP 0402/1005 RF" 149.762,363.195 r180 top
C245 "100nF" "CAP 0402/1005 RF" 143.345,356.472 r0 top
C246 "100nF" "CAP 0402/1005 RF" 147.155,362.306 r180 top
C247 "4.7uF" "CAP 0402/1005 RF" 139.671,359.004 r0 top
C248 "470nF" "CAP 0402/1005 RF" 150.965,356.218 r0 top
C249 "470nF" "CAP 0402/1005 RF" 149.753,360.147 r0 top
C250 "68nF" "CAP 0402/1005 RF" 139.671,363.703 r0 top
C251 "68nF" "CAP 0402/1005 RF" 143.336,360.655 r0 top
C252 "4.7uF" "CAP 0402/1005 RF" 152.861,361.163 r0 top
C253 "470nF" "CAP 0402/1005 RF" 152.861,363.068 r0 top
C254 "470nF" "CAP 0402/1005 RF" 152.87,363.957 r0 top
C255 "68nF" "CAP 0402/1005 RF" 139.662,362.814 r0 top
C256 "68nF" "CAP 0402/1005 RF" 143.345,359.639 r0 top
C257 "4.7uF" "CAP 0402/1005 RF" 152.861,362.052 r0 top
C258 "470nF" "CAP 0402/1005 RF" 156.036,363.322 r0 top
C259 "470nF" "CAP 0402/1005 RF" 156.163,361.163 r0 top
C260 "68nF" "CAP 0402/1005 RF" 156.036,365.227 r0 top
C261 "68nF" "CAP 0402/1005 RF" 156.036,367.132 r0 top
C262 "4.7uF" "CAP 0402/1005 RF" 156.036,362.306 r0 top
C263 "470nF" "CAP 0402/1005 RF" 156.163,360.147 r0 top
C264 "470nF" "CAP 0402/1005 RF" 156.036,364.211 r0 top
C265 "68nF" "CAP 0402/1005 RF" 156.036,366.116 r0 top
C266 "68nF" "CAP 0402/1005 RF" 152.861,360.147 r0 top
C267 "100nF" "CAP 0201/0603 RF" 374.155,408.05 r270 top
C268 "100nF" "CAP 0201/0603 RF" 373.393,407.923 r270 top
C269 "100nF" "CAP 0201/0603 RF" 371.234,408.298 r270 top
C270 "100nF" "CAP 0201/0603 RF" 370.472,408.31 r270 top
C271 "100nF" "CAP 0201/0603 RF" 229.006,511.285 r90 bottom
C272 "100nF" "CAP 0201/0603 RF" 229.923,511.353 r270 bottom
C273 "10nF" "CAP 0201/0603 RF" 174.671,285.377 r90 top
C274 "100nF" "CAP 0201/0603 RF" 232.816,511.013 r90 bottom
C275 "100nF" "CAP 0201/0603 RF" 287.109,281.403 r90 bottom
C276 "10nF" "CAP 0201/0603 RF" 173.838,285.376 r90 top
C277 "10nF" "CAP 0201/0603 RF" 177.09,280.822 r0 top
C278 "10nF" "CAP 0201/0603 RF" 175.446,280.822 r0 top
C279 "100nF" "CAP 0201/0603 RF" 76.165,331.869 r270 bottom
C280 "100nF" "CAP 0201/0603 RF" 75.415,331.869 r270 bottom
C281 "100nF" "CAP 0201/0603 RF" 73.298,331.869 r270 bottom
C282 "100nF" "CAP 0201/0603 RF" 72.508,331.869 r270 bottom
C283 "100nF" "CAP 0201/0603 RF" 67.338,325.38 r90 bottom
C284 "100nF" "CAP 0201/0603 RF" 68.081,325.38 r90 bottom
C285 "10nF" "CAP 0201/0603 RF" 173.147,285.377 r90 top
C286 "100nF" "CAP 0201/0603 RF" 70.04,325.38 r90 bottom
C287 "100nF" "CAP 0201/0603 RF" 70.725,325.38 r90 bottom
C288 "10nF" "CAP 0201/0603 RF" 175.433,285.377 r90 top
C289 "10nF" "CAP 0201/0603 RF" 157.569,299.149 r0 top
C290 "10nF" "CAP 0201/0603 RF" 155.976,299.069 r0 top
C291 "100nF" "CAP 0201/0603 RF" 192.113,211.867 r90 bottom
C292 "100nF" "CAP 0201/0603 RF" 192.875,211.867 r90 bottom
C293 "100nF" "CAP 0201/0603 RF" 195.161,211.867 r90 bottom
C294 "100nF" "CAP 0201/0603 RF" 195.923,211.867 r90 bottom
C295 "100nF" "CAP 0201/0603 RF" 198.875,211.867 r90 bottom
C296 "100nF" "CAP 0201/0603 RF" 198.113,211.867 r90 bottom
C297 "10nF" "CAP 0201/0603 RF" 171.539,285.388 r90 top
C298 "100nF" "CAP 0201/0603 RF" 201.945,211.867 r90 bottom
C299 "100nF" "CAP 0201/0603 RF" 201.183,211.867 r90 bottom
C300 "10nF" "CAP 0201/0603 RF" 172.301,285.388 r90 top
C301 "10nF" "CAP 0201/0603 RF" 157.569,300.546 r0 top
C302 "10nF" "CAP 0201/0603 RF" 155.976,300.466 r0 top
C303_I2C_Bridge "100nF" "CAP 0402/1005 RF" 365.392,71.231 r90 top (schematic designator C303)
C303_I2C_Bridge_2 "100nF" "CAP 0402/1005 RF" 1127.493,244.297 r90 top (schematic designator C303)
C303_I2C_Bridge_3 "100nF" "CAP 0402/1005 RF" 360.832,81.026 r90 top (schematic designator C303)
C304 "4.7µF" "CAP 0603/1608 RF" 447.942,34.836 r0 top
C305 "4.7µF" "CAP 0603/1608 RF" 452.26,34.836 r0 top
C306 "4.7µF" "CAP 0603/1608 RF" 456.578,34.836 r0 top
C307 "4.7µF" "CAP 0603/1608 RF" 460.896,34.836 r0 top
C308 "4.7 µF" "CAP 0603/1608 RF" 434.988,34.836 r0 top
C309_U_Pomiar_pradu_napiecia_1 "100nF" "CAP 0402/1005 RF" 360.832,136.677 r90 top (schematic designator C309)
C309_U_Pomiar_pradu_napiecia_2 "100nF" "CAP 0402/1005 RF" 359.74,144.301 r90 top (schematic designator C309)
C309_U_Pomiar_pradu_napiecia_3 "100nF" "CAP 0402/1005 RF" 360.832,149.631 r90 top (schematic designator C309)
C309_U_Pomiar_pradu_napiecia_4 "100nF" "CAP 0402/1005 RF" 360.832,156.108 r90 top (schematic designator C309)
C309_U_Pomiar_pradu_napiecia_5 "100nF" "CAP 0402/1005 RF" 362.585,160.004 r90 top (schematic designator C309)
C309_U_Pomiar_pradu_napiecia_6 "100nF" "CAP 0402/1005 RF" 362.928,167.852 r90 top (schematic designator C309)
C309_U_Pomiar_pradu_napiecia_7 "100nF" "CAP 0402/1005 RF" 360.832,175.539 r90 top (schematic designator C309)
C309_U_Pomiar_pradu_napiecia_8 "100nF" "CAP 0402/1005 RF" 360.832,182.016 r90 top (schematic designator C309)
C309_U_Pomiar_pradu_napiecia_9 "100nF" "CAP 0402/1005 RF" 360.832,188.493 r90 top (schematic designator C309)
C309_U_Pomiar_pradu_napiecia_10 "100nF" "CAP 0402/1005 RF" 362.61,195.139 r90 top (schematic designator C309)
C309_U_Pomiar_pradu_napiecia_11 "100nF" "CAP 0402/1005 RF" 362.915,202.053 r90 top (schematic designator C309)
C310 "100nF" "CAP 0402/1005 RF" 360.832,47.447 r90 top
C311_I2C_Expander1 "1uF" "CAP 0402/1005 RF" 360.832,65.43 r90 top (schematic designator C311)
C311_I2C_Expander2 "1uF" "CAP 0402/1005 RF" 363.353,68.386 r90 top (schematic designator C311)
C311_I2C_Expander3 "1uF" "CAP 0402/1005 RF" 360.832,78.384 r90 top (schematic designator C311)
C311_I2C_Expander? "1uF" "CAP 0402/1005 RF" 360.832,84.861 r90 top (schematic designator C311)
C311_I2C_Expander_10 "1uF" "CAP 0402/1005 RF" 360.832,91.338 r90 top (schematic designator C311)
C311_I2C_Expander_11 "1uF" "CAP 0402/1005 RF" 360.832,97.815 r90 top (schematic designator C311)
C311_I2C_Expander_12 "1uF" "CAP 0402/1005 RF" 360.832,104.292 r90 top (schematic designator C311)
C311_I2C_Expander_13 "1uF" "CAP 0402/1005 RF" 360.832,110.769 r90 top (schematic designator C311)
C311_I2C_Expander_14 "1uF" "CAP 0402/1005 RF" 362.42,116.9 r90 top (schematic designator C311)
C311_I2C_Expander_15 "1uF" "CAP 0402/1005 RF" 360.832,123.723 r90 top (schematic designator C311)
C311_I2C_Expander_16 "1uF" "CAP 0402/1005 RF" 360.705,128.19 r90 top (schematic designator C311)
C320 "10nF" "CAP 0402/1005 RF" 134.226,404.297 r270 top
C321 "3.3nF" "CAP 0603/1608 RF" 132.118,408.488 r180 top
C322 "27pF" "CAP 0402/1005 RF" 130.139,397.947 r180 top
C323 "27pF" "CAP 0402/1005 RF" 128.159,397.947 r0 top
C324 "10uF" "CAP 0805/2012 RF" 290.538,154.203 r90 top
C325 "100nF" "CAP 0402/1005 RF" 219.445,278.037 r270 top
C326 "1uF" "CAP 0402/1005 RF" 261.455,154.711 r90 top
C327 "1uF" "CAP 0402/1005 RF" 267.297,154.711 r90 top
C328 "1uF" "CAP 0402/1005 RF" 273.139,154.711 r90 top
C329 "1uF" "CAP 0402/1005 RF" 278.981,154.711 r90 top
C330 "100nF" "CAP 0402/1005 RF" 218.244,278.037 r270 top
C331 "1uF" "CAP 0402/1005 RF" 202.324,295.961 r270 top
C332 "1uF" "CAP 0402/1005 RF" 204.267,301.135 r0 top